# Altium PCB Zotino-DIOT.PCBDOC (part 4 of 11)
Units mil, origin at the board's own origin, x right, y up, seen from the top; angles counter-clockwise.
Board outline 8771.61 x 3949.04 mil, 4 copper layers (TopLayer, Internal Plane 2, Signal Layer 1, BottomLayer), stack 61.54 mil thick; 915 components, 534 nets, 3073 pads, 1180 vias.
Unrouted connection lines stored in the file: 36.
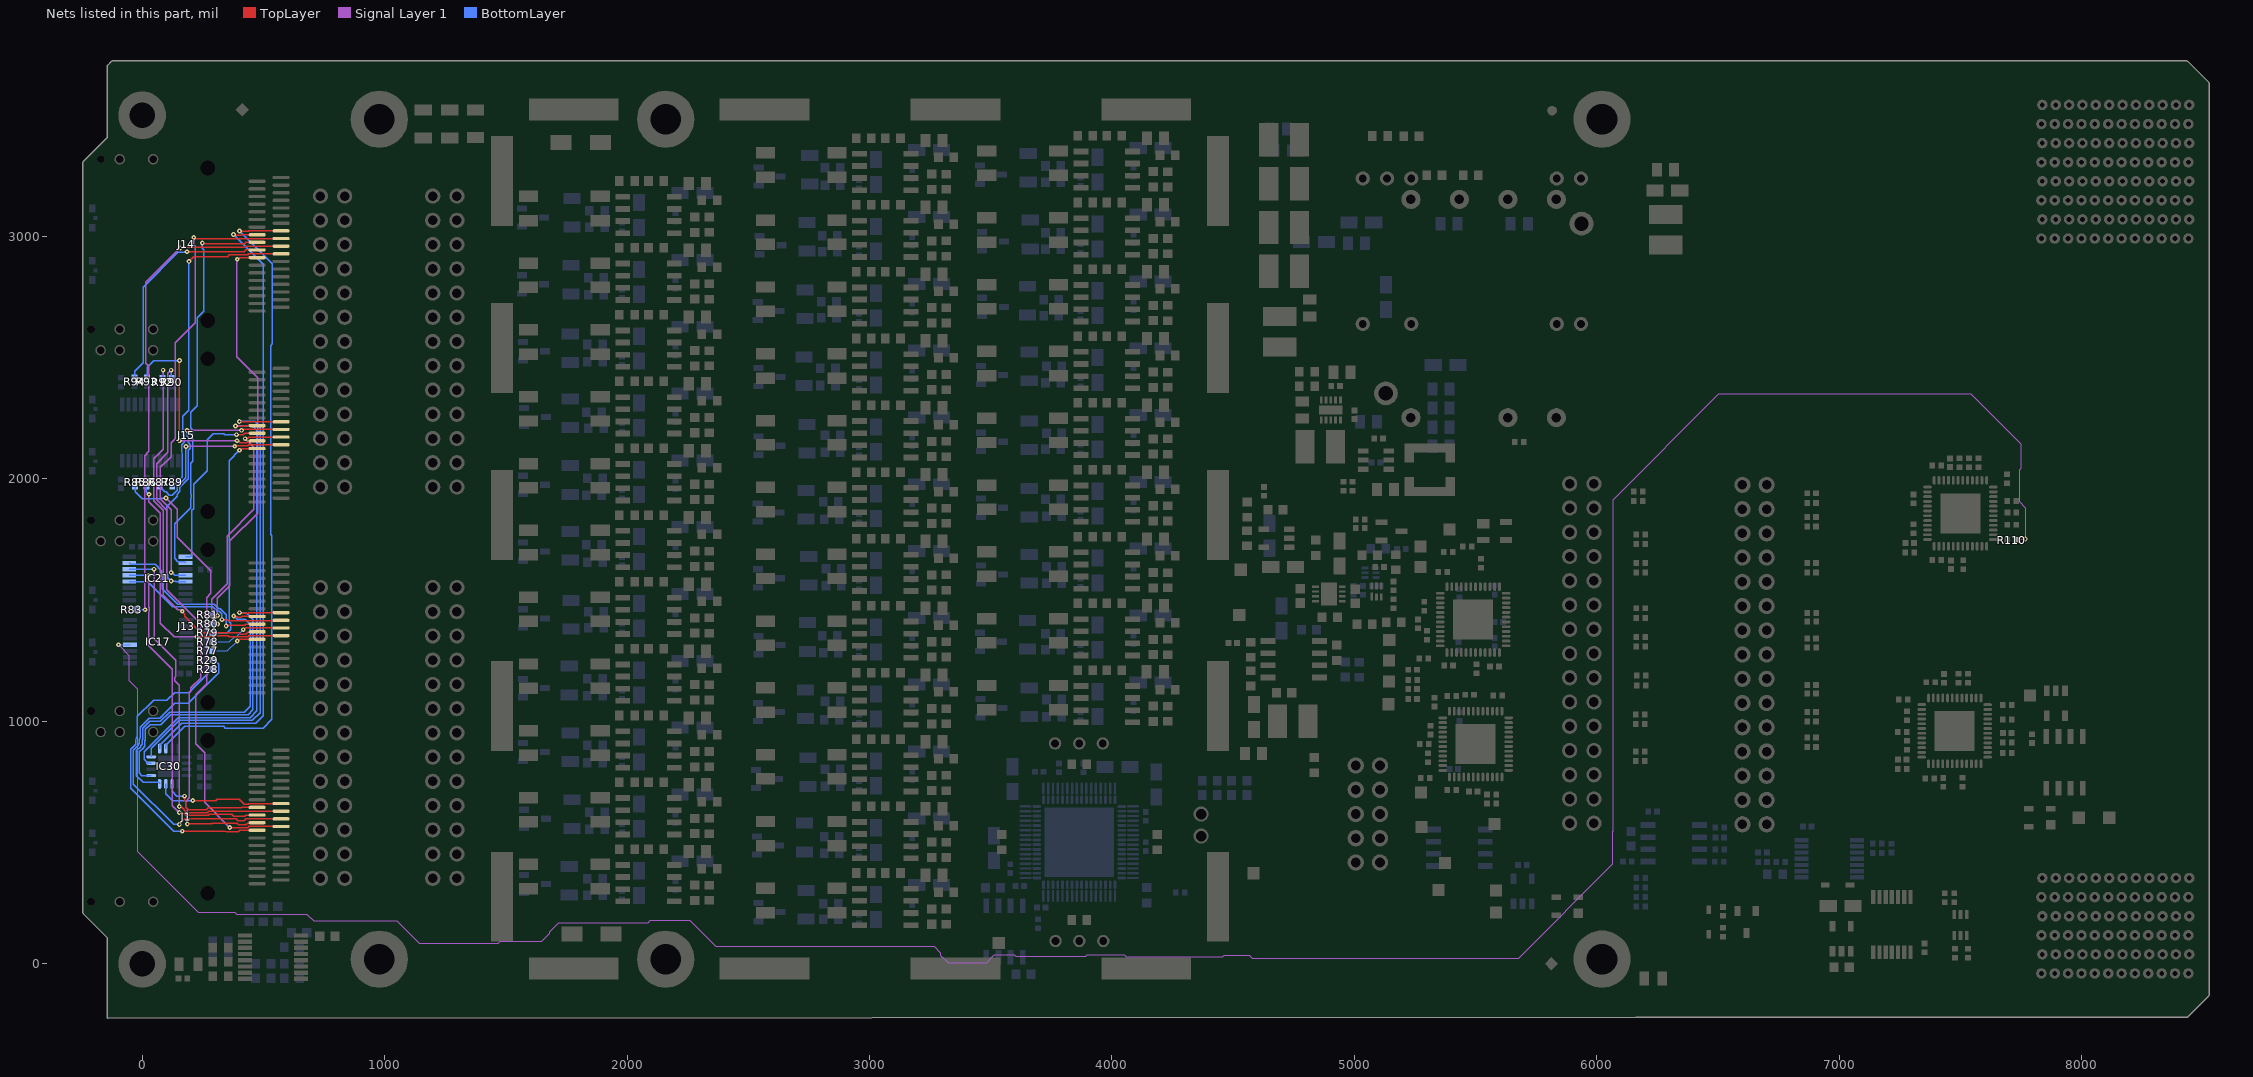
[diagram p5: the nets of this part, all layers, seen from the top]

## Part data (continued)
IC35: "4.75-28VDC to 1-6VDC, 500mA Step-Down Converter With Sleep Mode", Case=SON10, Manufacturer="TEXAS INSTRUMENTS", Author="CERN DEM JMW", Bonding=No, ComponentHeight=0.8mm, Component Type=Standard, CreateDate=11.08.2015, Device=TPS62175DQC, HelpURL=\\cern.ch\dfs\Applications\Altium\Datasheets\TPS62175DQC.pdf, LatestRevisionDate=11.08.2015, Manufacturer Part Number=TPS62175DQC, Mounted=Yes, PackageDescription="SON, 10-Leads, Body 2x3mm, Pitch 0.5mm, Thermal Pad 0.94x2.5mm, IPC Medium Density", Part Description="4.75-28VDC to 1-6VDC, 500mA Step-Down Converter With Sleep Mode", Part Number=TPS62175DQC, Pin Count=11, PressFit=No, Sense=No, SMD=Yes, Socket=No
J1 J13 J14 J15: library part MOLEX_75783-0107, "36 Circuit, Right Angle , Internal Assembly, iPass™ I/O Surface Mount Receptacle with Left Key Shell", Manufacturer=MOLEX, Manufacturer Part Number="75783-0107 / 75783-0136", Part Number="MOLEX 75783-0107 / 75783-0136", Author="CERN DEM JLC", Component Type=Standard, ComponentHeight=8.47mm, CreateDate=12.11.2014, Family=iPass™, HelpURL=\\cern.ch\dfs\Applications\Altium\Datasheets\MOLEX_75783-0107.pdf, LatestRevisionDate=12.11.2014, Mounted=Yes, Part Description="36 Circuit, Right Angle , Internal Assembly, iPass™ I/O Surface Mount Receptacle with Left Key Shell", Pin Count=42, PressFit=No, Sense=No, SMD=Yes, Socket=No, Status=None
J2: library part 3M_N2510-6002RB, "Connector 10 Male", Manufacturer=3M, Manufacturer Part Number=N2510-6002RB, Author="CERN DEM JLC", Component Type=Standard, ComponentHeight=10.03mm, CreateDate=11.02.2009, Family="Header 10", HelpURL=\\cern.ch\dfs\Applications\Altium\Datasheets\3M_N2510-6002RB.pdf, LatestRevisionDate=11.08.2009, Mounted=Yes, Part Description="10 Contacts - Straight .100'' x .100'' Low Profile Four-Wall Header, 2500 Series", Part Number=3M_N2510-6002RB, Pin Count=10, PressFit=No, Sense=No, SMD=No, Socket=No, Status=None
J3 J4 J5 J7: library part 3M_N2526-6002RB, "Connector 26 Male", Manufacturer=3M, Manufacturer Part Number=N2526-6002RB, Author="CERN DEM JLC", ComponentHeight=10.03mm, Component Type=Standard, CreateDate=11.02.2009, Family="Header 26", HelpURL=\\cern.ch\dfs\Applications\Altium\Datasheets\3M_N2526-6002RB.pdf, LatestRevisionDate=11.08.2009, Mounted=Yes, Part Description="26 Contacts - Straight .100'' x .100'' Low Profile Four-Wall Header, 2500 Series", Part Number=3M_N2526-6002RB, Pin Count=26, PressFit=No, Sense=No, SMD=No, Socket=No, Status=None
J6 J37: library part 3M_N2530-6002RB, "Connector 30 Male", Manufacturer=3M, Manufacturer Part Number=N2530-6002RB, Author="CERN DEM JLC", Component Type=Standard, ComponentHeight=10.03mm, CreateDate=11.02.2009, Family="Header 30", HelpURL=\\cern.ch\dfs\Applications\Altium\Datasheets\3M_N2530-6002RB.pdf, LatestRevisionDate=11.08.2009, Mounted=Yes, Part Description="30 Contacts - Straight .100'' x .100'' Low Profile Four-Wall Header, 2500 Series", Part Number=3M_N2530-6002RB, Pin Count=30, PressFit=No, Sense=No, SMD=No, Socket=No, Status=None
J8: library part AMPHENOL_10052825-101LF, "72 Contacts Header, 6 Columns, 4 Pairs per Column", Manufacturer=AMPHENOL, Manufacturer Part Number=10052825-101LF, Author="CERN DEM MR", ClassName=Overlapping, Component Type=Standard, ComponentHeight=15.35mm, ComponentLink1Description=Application, ComponentLink1URL=\\cern.ch\dfs\Applications\Altium\Datasheets\AMPHENOL_10052825-101LF_Application.pdf, CreateDate=19/02/2018, Family="AirMax VS", HelpURL=\\cern.ch\dfs\Applications\Altium\Datasheets\AMPHENOL_10052825-101LF.pdf, LatestRevisionDate=19/02/2018, Mounted=Yes, Part Description="72 Contacts, 2mm Pitch, 6 Columns, 4 Pairs per Column, 4 Walls, Right Angle Header", Part Number=AMPHENOL_10052825-101LF, Pin Count=72, PressFit=Yes, Sense=No, SMD=No, Socket=No, Status=None
J9: library part AMPHENOL_10052838-101LF, "96 Contacts Header, 8 Columns, 4 Pairs per Column", Manufacturer=AMPHENOL, Manufacturer Part Number=10052838-101LF, Author="CERN DEM MR", Component Type=Standard, ComponentHeight=15.35mm, ComponentLink1Description=Application, ComponentLink1URL=\\cern.ch\dfs\Applications\Altium\Datasheets\AMPHENOL_10052838-101LF_Application.pdf, CreateDate=19.02.2018, Family="AirMax VS", HelpURL=\\cern.ch\dfs\Applications\Altium\Datasheets\AMPHENOL_10052838-101LF.pdf, LatestRevisionDate=19.02.2018, Mounted=Yes, Part Description="96 Contacts, 2mm Pitch, 8 Columns, 4 Pairs per Column, 4 Walls, Right Angle Header", Part Number=AMPHENOL_10052838-101LF, Pin Count=96, PressFit=Yes, Sense=No, SMD=No, Socket=No, Status=None
L1 L3 L6 L7 L8 L9 L15 L16: library part IND_10UH_10%_MURATA-PS_8400, "Inductor With Core", Manufacturer="MURATA POWER SOLUTIONS", Manufacturer Part Number=84103C, Power=950mA, Resistance=0.24R, Tolerance=±10%, Author="CERN DEM JLC", ComponentHeight=2.9mm, Component Type=Standard, CreateDate=02.07.2012, HelpURL=\\cern.ch\dfs\Applications\Altium\Datasheets\IND_MURATA-PS_8400.pdf, LatestRevisionDate=02.07.2012, Mounted=Yes, Part Description="Miniature Surface Mount Power Inductor (8400 Serie)", Part Number=IND_10UH_10%_MURATA-PS_8400, Pin Count=2, Sense=No, SMD=Yes, Socket=No, Status=None
L2: library part IND_3.3UH_30%_WURTH_WE-TPC_744043003, "Inductor With Core", Manufacturer="WURTH ELEKTRONIK", Manufacturer Part Number=744043003, Power=2.15A, Resistance=0.03R, Tolerance=±30%, Author="CERN DEM JLC", Component Type=Standard, ComponentHeight=3mm, CreateDate=12.07.2011, HelpURL=\\cern.ch\dfs\Applications\Altium\Datasheets\IND_WURTH_WE-TPC_744043003.pdf, LatestRevisionDate=24.01.2012, Mounted=Yes, Part Description="Shielded Tiny Power Inductor (WE-TPC Serie)", Part Number=IND_3.3UH_30%_WURTH_WE-TPC_744043003, Pin Count=2, Sense=No, SMD=Yes, Socket=No
L4_1 L4_2 L4_3 L4_4 L4_5 L4_6 L4_7 L4_8 L4_9 L4_10 L4_11 L4_12 L4_13 L4_14 L4_15 L4_16 L4_17 L4_18 L4_19 L4_20 L4_21 L4_22 L4_23 L4_24 L4_25 L4_26 L4_27 L4_28 L4_29 L4_30 L4_31 L4_32: library part IND_6.5MH_50%_WURTH_WE-SL2-744229, "Inductor Common Mode", Manufacturer="WURTH ELEKTRONIK", Manufacturer Part Number=744229, Power=400mA, Resistance=0.95R, Tolerance=±50%, Author="CERN DEM JLC", ComponentHeight=5.3mm, Component Type=Standard, CreateDate=01.10.2012, HelpURL=\\cern.ch\dfs\Applications\Altium\Datasheets\IND_WURTH_WE-SL2_744229.pdf, LatestRevisionDate=15.10.2012, Mounted=Yes, Part Description="Common Mode SMD Line Filter (WE-SL2 Serie)", Part Number=IND_6.5MH_50%_WURTH_WE-SL2-744229, Pin Count=4, Sense=No, SMD=Yes, Socket=No, Status=None
LD1 LD2 LD3 LD4 LD5 LD6 LD7 LD8: library part LED_AVAGO_HSME-C120, "LED Green 1C 2A", Manufacturer="AVAGO TECHNOLOGIES", Manufacturer Part Number=HSME-C120, Author="CERN DEM JMW", Bonding=No, Color=Green, Component Type=Standard, ComponentHeight=0.7mm, ComponentLink1Description="Design Guide", ComponentLink1URL=\\cern.ch\dfs\Applications\Altium\Datasheets\LED_AVAGO_HSME-C110_DESIGN-GUIDE.pdf, CreateDate=22.07.2009, HelpURL=\\cern.ch\dfs\Applications\Altium\Datasheets\LED_AVAGO_HSME-C120.pdf, LatestRevisionDate=20.06.2012, Mounted=Yes, PackageDescription="Green Chip LED, 2-Leads, Body 1.7x1.1mm, Side Emitting Package", Part Description="High Performance Right Angle Chip Green LED", Part Number=LED_AVAGO_HSME-C120, Pin Count=2, PressFit=No, Sense=No, SMD=Yes, Socket=No
R1 R15 R26 R68_1 R68_2 R68_3 R68_4 R68_5 R68_6 R68_7 R68_8 R68_9 R68_10 R68_11 R68_12 R68_13 R68_14 R68_15 R68_16 R68_17 R68_18 R68_19 R68_20 R68_21 R68_22 R68_23 R68_24 R68_25 R68_26 R68_27 R68_28 R68_29 R68_30 R68_31 R68_32: library part R0603_NO-VALUE, "Resistor", Case=0603, Author="CERN DEM JLC", Component Type=Standard, CreateDate=03.12.2007, HelpURL=Undefined, LatestRevisionDate=13.03.2008, Manufacturer=Undefined, Manufacturer1 ComponentHeight=Undefined, Manufacturer1 Example=Undefined, Manufacturer1 Part Number=Undefined, Manufacturer Part Number=R0603_NO-VALUE, Mounted=No, Part Description="Reserved Footprint For a 0603 (1608) Chip Resistor", Part Number=R0603_NO-VALUE, Pin Count=2, Sense=No, SMD=Yes, Socket=No, Status=None
R2 R3 R11 R13 R14 R37 R41 R42 R45 R46 R47 R48 R49 R50 R51 R52 R53 R54 R55 R56 R57 R59 R60 R61 R62 R63 R64 R65 R66 R71 R72 R88 R97 R99 R100 R101 R104 R107 R110 R125 R128 R131 R135 R136 R137 R138 R139 R140 R142 R143 R145 R146 R148 R149 R152 R154 R155 R156 R158 R159 R161 R165 R183 R221: library part R0402_0R_JUMPER, "Resistor", Case=0402, Manufacturer=GENERIC, Manufacturer1 ComponentHeight=0.4mm, Manufacturer1 Example="YAGEO PHYCOMP", Manufacturer1 Part Number=232270591001L, Author="CERN DEM JLC", Component Type=Standard, CreateDate=03.12.2007, HelpURL=\\cern.ch\dfs\Applications\Altium\Datasheets\R0402_Phycomp_RC0402.pdf, LatestRevisionDate=17.10.2012, Manufacturer Part Number=R0402_0R_JUMPER, Mounted=Yes, Part Description="1A (0.05R Max DC Resistance) Zero Ohm Jumper", Part Number=R0402_0R_JUMPER, Pin Count=2, Sense=No, SMD=Yes, Socket=No
  R2 R3 R11 R13 R14 R37 R41 R42 R51 R88 R97 R99 R100 R101 R104 R107 R110 R125 R128 R131 R135 R183 R221: Status="Not recommended"
  R45 R46 R47 R48 R49 R50 R52 R53 R54 R55 R56 R57 R59 R60 R61 R62 R63 R64 R65 R66 R71 R72 R136 R137 R138 R139 R140 R142 R143 R145 R146 R148 R149 R152 R154 R155 R156 R158 R159 R161 R165: PressFit=No, Status="Not Recommended"
R4: library part R0603_36K_1%_0.1W_100PPM, "Resistor - 1%", Case=0603, Manufacturer=GENERIC, Manufacturer1 ComponentHeight=0.55mm, Manufacturer1 Example="NIC COMPONENT", Manufacturer1 Part Number=NRC06F3602TRF, Power=0.1W, Tolerance=±1%, Author="CERN DEM JLC", Component Type=Standard, CreateDate=03.12.2007, HelpURL=\\cern.ch\dfs\Applications\Altium\Datasheets\R0603_NIC_NRC.pdf, LatestRevisionDate=13.03.2008, Manufacturer Part Number=R0603_36K_1%_0.1W_100PPM, Mounted=Yes, Part Description="General Purpose Thick Film Chip Resistor", Part Number=R0603_36K_1%_0.1W_100PPM, Pin Count=2, PressFit=No, Sense=No, SMD=Yes, Socket=No, Status=Preferred, TC=±100ppm/°C
R5_1 R5_2 R5_3 R5_4 R5_5 R5_6 R5_7 R5_8 R5_9 R5_10 R5_11 R5_12 R5_13 R5_14 R5_15 R5_16 R5_17 R5_18 R5_19 R5_20 R5_21 R5_22 R5_23 R5_24 R5_25 R5_26 R5_27 R5_28 R5_29 R5_30 R5_31 R5_32 R7_1 R7_2 R7_3 R7_4 R7_5 R7_6 R7_7 R7_8 R7_9 R7_10 R7_11 R7_12 R7_13 R7_14 R7_15 R7_16 R7_17 R7_18 R7_19 R7_20 R7_21 R7_22 R7_23 R7_24 R7_25 R7_26 R7_27 R7_28 R7_29 R7_30 R7_31 R7_32 R40: library part R0603_1K_1%_0.1W_100PPM, "Resistor - 1%", Case=0603, Manufacturer=GENERIC, Manufacturer1 ComponentHeight=0.55mm, Manufacturer1 Example="NIC COMPONENT", Manufacturer1 Part Number=NRC06F1001TRF, Power=0.1W, Tolerance=±1%, Author="CERN DEM JLC", Component Type=Standard, CreateDate=03.12.2007, HelpURL=\\cern.ch\dfs\Applications\Altium\Datasheets\R0603_NIC_NRC.pdf, LatestRevisionDate=13.03.2008, Manufacturer Part Number=R0603_1K_1%_0.1W_100PPM, Mounted=Yes, Part Description="General Purpose Thick Film Chip Resistor", Part Number=R0603_1K_1%_0.1W_100PPM, Pin Count=2, PressFit=No, Sense=No, SMD=Yes, Socket=No, Status=Preferred, TC=±100ppm/°C
R6 R16 R17 R18 R19 R20 R21 R22 R23 R95 R96 R98 R102 R103 R105 R106 R108 R109 R111 R112 R124 R126 R127 R129 R130 R133 R134 R141 R144 R147 R151 R157 R160 R163 R166 R170: library part R0402_100R_1%_0.1W_100PPM, "Resistor - 1%", Case=0402, Manufacturer=GENERIC, Manufacturer1 ComponentHeight=0.4mm, Manufacturer1 Example=PANASONIC, Manufacturer1 Part Number=ERJ2RKF1000X, Manufacturer Part Number=R0402_100R_1%_0.1W_100PPM_50V, Power=0.1W, Tolerance=±1%, Voltage=50V, Author="CERN DEM JLC", Component Type=Standard, CreateDate=12.12.2013, HelpURL=\\cern.ch\dfs\Applications\Altium\Datasheets\R0402_PANASONIC_ERJ2RK.pdf, LatestRevisionDate=03.03.2015, Mounted=Yes, Part Description="General Purpose Thick Film Chip Resistor", Part Number=R0402_100R_1%_0.1W_100PPM, Pin Count=2, Sense=No, SMD=Yes, Socket=No, Status="Not recommended", TC=±100ppm/°C
R8 R9 R10 R12 R58 R82 R113 R114 R115 R116 R117 R118 R119 R120 R121 R122 R123: library part R0603_220R_1%_0.1W_100PPM, "Resistor - 1%", Case=0603, Manufacturer=GENERIC, Manufacturer1 ComponentHeight=0.55mm, Manufacturer1 Example="NIC COMPONENT", Manufacturer1 Part Number=NRC06F2200TRF, Power=0.1W, Tolerance=±1%, Author="CERN DEM JLC", Component Type=Standard, CreateDate=03.12.2007, HelpURL=\\cern.ch\dfs\Applications\Altium\Datasheets\R0603_NIC_NRC.pdf, LatestRevisionDate=13.03.2008, Manufacturer Part Number=R0603_220R_1%_0.1W_100PPM, Mounted=Yes, Part Description="General Purpose Thick Film Chip Resistor", Part Number=R0603_220R_1%_0.1W_100PPM, Pin Count=2, Sense=No, SMD=Yes, Socket=No, Status=Preferred, TC=±100ppm/°C
R24_1 R24_2 R24_3 R24_4 R24_5 R24_6 R24_7 R24_8 R24_9 R24_10 R24_11 R24_12 R24_13 R24_14 R24_15 R24_16 R24_17 R24_18 R24_19 R24_20 R24_21 R24_22 R24_23 R24_24 R24_25 R24_26 R24_27 R24_28 R24_29 R24_30 R24_31 R24_32: library part R0603_2K32_0.1%_0.063W_10PPM, "Resistor - 0.1%", Case=0603, Manufacturer=GENERIC, Manufacturer1 ComponentHeight=0.5mm, Manufacturer1 Example="TYCO HOLSWORTHY", Manufacturer1 Part Number=RN73C1J2K32BTDF, Power=0.063W, Tolerance=±0.1%, Author="CERN DEM JLC", Component Type=Standard, CreateDate=03.12.2007, HelpURL=\\cern.ch\dfs\Applications\Altium\Datasheets\R0603_Tyco_RN73.pdf, LatestRevisionDate=13.03.2008, Manufacturer Part Number=R0603_2K32_0.1%_0.063W_10PPM, Mounted=Yes, Part Description="Thin Film Chip Resistor", Part Number=R0603_2K32_0.1%_0.063W_10PPM, Pin Count=2, Sense=No, SMD=Yes, Socket=No, Status="Not recommended", TC=±10ppm
R25_1 R25_2 R25_3 R25_4 R25_5 R25_6 R25_7 R25_8 R25_9 R25_10 R25_11 R25_12 R25_13 R25_14 R25_15 R25_16 R25_17 R25_18 R25_19 R25_20 R25_21 R25_22 R25_23 R25_24 R25_25 R25_26 R25_27 R25_28 R25_29 R25_30 R25_31 R25_32: library part R0603_9K09_0.1%_0.063W_10PPM, "Resistor - 0.1%", Case=0603, Manufacturer=GENERIC, Manufacturer1 ComponentHeight=0.5mm, Manufacturer1 Example="TYCO HOLSWORTHY", Manufacturer1 Part Number=RN73C1J9K09BTDF, Power=0.063W, Tolerance=±0.1%, Author="CERN DEM JLC", Component Type=Standard, CreateDate=03.12.2007, HelpURL=\\cern.ch\dfs\Applications\Altium\Datasheets\R0603_Tyco_RN73.pdf, LatestRevisionDate=13.03.2008, Manufacturer Part Number=R0603_9K09_0.1%_0.063W_10PPM, Mounted=Yes, Part Description="Thin Film Chip Resistor", Part Number=R0603_9K09_0.1%_0.063W_10PPM, Pin Count=2, Sense=No, SMD=Yes, Socket=No, Status="Not recommended", TC=±10ppm
R27: library part R0603_12K7_0.1%_0.063W_10PPM, "Resistor - 0.1%", Case=0603, Manufacturer=GENERIC, Manufacturer1 ComponentHeight=0.5mm, Manufacturer1 Example="TYCO HOLSWORTHY", Manufacturer1 Part Number=RN73C1J12K7BTDF, Power=0.063W, Tolerance=±0.1%, Author="CERN DEM JLC", Component Type=Standard, CreateDate=03.12.2007, HelpURL=\\cern.ch\dfs\Applications\Altium\Datasheets\R0603_Tyco_RN73.pdf, LatestRevisionDate=13.03.2008, Manufacturer Part Number=R0603_12K7_0.1%_0.063W_10PPM, Mounted=Yes, Part Description="Thin Film Chip Resistor", Part Number=R0603_12K7_0.1%_0.063W_10PPM, Pin Count=2, PressFit=No, Sense=No, SMD=Yes, Socket=No, Status="Not Recommended", TC=±10ppm
R28 R29 R77 R78 R79 R80 R81 R83 R85 R86 R87 R89 R90 R92 R93 R94: library part R0402_33R_1%_0.0625W_100PPM, "Resistor - 1%", Case=0402, Manufacturer=GENERIC, Manufacturer1 ComponentHeight=0.4mm, Manufacturer1 Example="YAGEO PHYCOMP", Manufacturer1 Part Number=232270673309L, Power=0.0625W, Tolerance=±1%, Author="CERN DEM JLC", Component Type=Standard, CreateDate=03.12.2007, HelpURL=\\cern.ch\dfs\Applications\Altium\Datasheets\R0402_Phycomp_RC0402.pdf, LatestRevisionDate=17.10.2012, Manufacturer Part Number=R0402_33R_1%_0.0625W_100PPM, Mounted=Yes, Part Description="General Purpose Thick Film Chip Resistor", Part Number=R0402_33R_1%_0.0625W_100PPM, Pin Count=2, PressFit=No, Sense=No, SMD=Yes, Socket=No, Status="Not Recommended", TC=±100ppm/°C
R30 R31 R32: library part R1206_NO-VALUE, "Resistor", Case=1206, Manufacturer1 ComponentHeight=0.65mm, Author="CERN DEM JLC", Component Type=Standard, CreateDate=03.12.2007, HelpURL=Undefined, LatestRevisionDate=13.03.2008, Manufacturer=Undefined, Manufacturer1 Example=Undefined, Manufacturer1 Part Number=Undefined, Manufacturer Part Number=R1206_NO-VALUE, Mounted=No, Part Description="Reserved Footprint For a 1206 (3216) Chip Resistor", Part Number=R1206_NO-VALUE, Pin Count=2, PressFit=No, Sense=No, SMD=Yes, Socket=No, Status=None
R33: library part R0402_31K6_0.1%_0.063W_25PPM_YAGEO_RT, "Resistor - 0.1%", Case=0402, Manufacturer=YAGEO, Manufacturer Part Number=RT0402BRD0731K6L, Power=0.063W, Tolerance=±0.1%, Voltage=50V, Author="CERN DEM BC", Component Type=Standard, ComponentHeight=0.35mm, CreateDate=30.07.2020, HelpURL=\\cern.ch\dfs\Applications\Altium\Datasheets\R0402_YAGEO_RT.pdf, LatestRevisionDate=30.07.2020, Mounted=Yes, Part Description="Thin Film Chip Resistor", Part Number=R0402_31K6_0.1%_0.063W_25PPM_YAGEO_RT, Pin Count=2, PressFit=No, Sense=No, SMD=Yes, Socket=No, Status="Not Recommended", TC=±25ppm/°C
R34 R36 R38 R76 R84 R132 R171 R220 R224 R225 R229: library part R0402_10K_1%_0.0625W_100PPM, "Resistor - 1%", Case=0402, Manufacturer=GENERIC, Manufacturer1 ComponentHeight=0.4mm, Manufacturer1 Example="YAGEO PHYCOMP", Manufacturer1 Part Number=232270671003L, Power=0.0625W, Tolerance=±1%, Author="CERN DEM JLC", Component Type=Standard, HelpURL=\\cern.ch\dfs\Applications\Altium\Datasheets\R0402_Phycomp_RC0402.pdf, Manufacturer Part Number=R0402_10K_1%_0.0625W_100PPM, Mounted=Yes, Part Description="General Purpose Thick Film Chip Resistor", Part Number=R0402_10K_1%_0.0625W_100PPM, Pin Count=2, Sense=No, SMD=Yes, Socket=No, TC=±100ppm/°C
  R34 R36 R38 R132 R171: CreateDate=03.12.2007, LatestRevisionDate=17.10.2012, Status="Not recommended"
  R76 R220 R229: CreateDate=2007-12-03, LatestRevisionDate=2012-10-17, PressFit=No, Status="Not Recommended"
  R84 R224 R225: CreateDate=03.12.2007, LatestRevisionDate=17.10.2012, PressFit=No, Status="Not Recommended"
R35 R39 R43 R69 R150: library part R0603_24K_1%_0.1W_100PPM, "Resistor - 1%", Case=0603, Manufacturer=GENERIC, Manufacturer1 ComponentHeight=0.55mm, Manufacturer1 Example="NIC COMPONENT", Manufacturer1 Part Number=NRC06F2402TRF, Power=0.1W, Tolerance=±1%, Author="CERN DEM JLC", Component Type=Standard, CreateDate=03.12.2007, HelpURL=\\cern.ch\dfs\Applications\Altium\Datasheets\R0603_NIC_NRC.pdf, LatestRevisionDate=13.03.2008, Manufacturer Part Number=R0603_24K_1%_0.1W_100PPM, Mounted=Yes, Part Description="General Purpose Thick Film Chip Resistor", Part Number=R0603_24K_1%_0.1W_100PPM, Pin Count=2, Sense=No, SMD=Yes, Socket=No, Status=Preferred, TC=±100ppm/°C
R44 R70 R153 R222: library part R0603_2K7_1%_0.1W_100PPM, "Resistor - 1%", Case=0603, Manufacturer=GENERIC, Manufacturer1 ComponentHeight=0.55mm, Manufacturer1 Example="YAGEO PHYCOMP", Manufacturer1 Part Number=RC0603FR-072K7L, Power=0.1W, Tolerance=±1%, Author="CERN DEM JLC", Component Type=Standard, HelpURL=\\cern.ch\dfs\Applications\Altium\Datasheets\R0603_PHYCOMP_RC0603.pdf, Manufacturer Part Number=R0603_2K7_1%_0.1W_100PPM, Mounted=Yes, Part Description="General Purpose Thick Film Chip Resistor", Part Number=R0603_2K7_1%_0.1W_100PPM, Pin Count=2, Sense=No, SMD=Yes, Socket=No, Status=Preferred, TC=±100ppm/°C
  R44 R70 R153: CreateDate=02.05.2011, LatestRevisionDate=02.05.2011
  R222: CreateDate=2011-05-02, LatestRevisionDate=2011-05-02, PressFit=No
R67_1 R67_2 R67_3 R67_4 R67_5 R67_6 R67_7 R67_8 R67_9 R67_10 R67_11 R67_12 R67_13 R67_14 R67_15 R67_16 R67_17 R67_18 R67_19 R67_20 R67_21 R67_22 R67_23 R67_24 R67_25 R67_26 R67_27 R67_28 R67_29 R67_30 R67_31 R67_32: library part R0603_11K_1%_0.1W_100PPM, "Resistor - 1%", Case=0603, Manufacturer=GENERIC, Manufacturer1 ComponentHeight=0.55mm, Manufacturer1 Example="NIC COMPONENT", Manufacturer1 Part Number=NRC06F1102TRF, Power=0.1W, Tolerance=±1%, Author="CERN DEM JLC", Component Type=Standard, CreateDate=03.12.2007, HelpURL=\\cern.ch\dfs\Applications\Altium\Datasheets\R0603_NIC_NRC.pdf, LatestRevisionDate=13.03.2008, Manufacturer Part Number=R0603_11K_1%_0.1W_100PPM, Mounted=Yes, Part Description="General Purpose Thick Film Chip Resistor", Part Number=R0603_11K_1%_0.1W_100PPM, Pin Count=2, Sense=No, SMD=Yes, Socket=No, Status=Preferred, TC=±100ppm/°C
R73: library part R0805_1M1_1%_0.125W_100PPM, "Resistor - 1%", Case=0805, Manufacturer=GENERIC, Manufacturer1 ComponentHeight=0.6mm, Manufacturer1 Example="NIC COMPONENT", Manufacturer1 Part Number=NRC10F1104TRF, Power=0.125W, Tolerance=±1%, Author="CERN DEM JLC", Component Type=Standard, CreateDate=03/12/2007, HelpURL=\\cern.ch\dfs\Applications\Altium\Datasheets\R0805_NIC_NRC.pdf, LatestRevisionDate=13/03/2008, Manufacturer Part Number=R0805_1M1_1%_0.125W_100PPM, Mounted=Yes, Part Description="General Purpose Thick Film Chip Resistor", Part Number=R0805_1M1_1%_0.125W_100PPM, Pin Count=2, PressFit=No, Sense=No, SMD=Yes, Socket=No, Status=Preferred, TC=±100ppm/°C
R74 R75: library part "R0805_10M_1%_0.125W_100PPM_VISHAY_CRCW e3", "Resistor - 1%", Case=0805, Manufacturer="VISHAY DALE", Manufacturer Part Number=CRCW080510M0FKEA, Power=0.125W, Tolerance=±1%, Author="CERN DEM BC", Component Type=Standard, ComponentHeight=0.5mm, CreateDate=2019-11-12, HelpURL="\\cern.ch\dfs\Applications\Altium\Datasheets\R0805_VISHAY_CRCW e3.pdf", LatestRevisionDate=2019-11-12, Mounted=Yes, Part Description="150V, Standard Thick Film Chip Resistor", Part Number="R0805_10M_1%_0.125W_100PPM_VISHAY_CRCW e3", Pin Count=2, PressFit=No, Sense=No, SMD=Yes, Socket=No, Status=None, TC=±100ppm/°C
R91 R298: library part R0402_240R_1%_0.0625W_100PPM, "Resistor - 1%", Case=0402, Manufacturer=GENERIC, Manufacturer1 ComponentHeight=0.4mm, Manufacturer1 Example="YAGEO PHYCOMP", Manufacturer1 Part Number=232270672401L, Power=0.0625W, Tolerance=±1%, Author="CERN DEM JLC", Component Type=Standard, CreateDate=03.12.2007, HelpURL=\\cern.ch\dfs\Applications\Altium\Datasheets\R0402_Phycomp_RC0402.pdf, LatestRevisionDate=17.10.2012, Manufacturer Part Number=R0402_240R_1%_0.0625W_100PPM, Mounted=Yes, Part Description="General Purpose Thick Film Chip Resistor", Part Number=R0402_240R_1%_0.0625W_100PPM, Pin Count=2, PressFit=No, Sense=No, SMD=Yes, Socket=No, Status="Not Recommended", TC=±100ppm/°C
R162: library part R0603_270K_1%_0.1W_100PPM, "Resistor - 1%", Case=0603, Manufacturer=GENERIC, Manufacturer1 ComponentHeight=0.55mm, Manufacturer1 Example="NIC COMPONENT", Manufacturer1 Part Number=NRC06F2703TRF, Power=0.1W, Tolerance=±1%, Author="CERN DEM JLC", Component Type=Standard, CreateDate=03.12.2007, HelpURL=\\cern.ch\dfs\Applications\Altium\Datasheets\R0603_NIC_NRC.pdf, LatestRevisionDate=13.03.2008, Manufacturer Part Number=R0603_270K_1%_0.1W_100PPM, Mounted=Yes, Part Description="General Purpose Thick Film Chip Resistor", Part Number=R0603_270K_1%_0.1W_100PPM, Pin Count=2, Sense=No, SMD=Yes, Socket=No, Status=Preferred, TC=±100ppm/°C
R164: library part R0603_82K_1%_0.1W_100PPM, "Resistor - 1%", Case=0603, Manufacturer=GENERIC, Manufacturer1 ComponentHeight=0.55mm, Manufacturer1 Example="NIC COMPONENT", Manufacturer1 Part Number=NRC06F8202TRF, Power=0.1W, Tolerance=±1%, Author="CERN DEM JLC", Component Type=Standard, CreateDate=03.12.2007, HelpURL=\\cern.ch\dfs\Applications\Altium\Datasheets\R0603_NIC_NRC.pdf, LatestRevisionDate=13.03.2008, Manufacturer Part Number=R0603_82K_1%_0.1W_100PPM, Mounted=Yes, Part Description="General Purpose Thick Film Chip Resistor", Part Number=R0603_82K_1%_0.1W_100PPM, Pin Count=2, Sense=No, SMD=Yes, Socket=No, Status=Preferred, TC=±100ppm/°C
R185 R205: library part R0402_22R_1%_0.0625W_100PPM, "Resistor - 1%", Case=0402, Manufacturer=GENERIC, Manufacturer1 ComponentHeight=0.4mm, Manufacturer1 Example="YAGEO PHYCOMP", Manufacturer1 Part Number=232270672209L, Power=0.0625W, Tolerance=±1%, Author="CERN DEM JLC", Component Type=Standard, CreateDate=03.12.2007, HelpURL=\\cern.ch\dfs\Applications\Altium\Datasheets\R0402_Phycomp_RC0402.pdf, LatestRevisionDate=17.10.2012, Manufacturer Part Number=R0402_22R_1%_0.0625W_100PPM, Mounted=Yes, Part Description="General Purpose Thick Film Chip Resistor", Part Number=R0402_22R_1%_0.0625W_100PPM, Pin Count=2, PressFit=No, Sense=No, SMD=Yes, Socket=No, Status="Not Recommended"
R223: library part R0402_5K6_1%_0.0625W_100PPM, "Resistor - 1%", Case=0402, Manufacturer=GENERIC, Manufacturer1 ComponentHeight=0.4mm, Manufacturer1 Example="YAGEO PHYCOMP", Manufacturer1 Part Number=232270675602L, Power=0.0625W, Tolerance=±1%, Author="CERN DEM JLC", Component Type=Standard, CreateDate=2007-12-03, HelpURL=\\cern.ch\dfs\Applications\Altium\Datasheets\R0402_Phycomp_RC0402.pdf, LatestRevisionDate=2012-10-17, Manufacturer Part Number=R0402_5K6_1%_0.0625W_100PPM, Mounted=Yes, Part Description="General Purpose Thick Film Chip Resistor", Part Number=R0402_5K6_1%_0.0625W_100PPM, Pin Count=2, PressFit=No, Sense=No, SMD=Yes, Socket=No, Status="Not Recommended", TC=±100ppm/°C
R226 R227: library part R0402_1K6_1%_0.0625W_100PPM, "Resistor - 1%", Case=0402, Manufacturer=GENERIC, Manufacturer1 ComponentHeight=0.4mm, Manufacturer1 Example="YAGEO PHYCOMP", Manufacturer1 Part Number=232270671602L, Power=0.0625W, Tolerance=±1%, Author="CERN DEM JLC", Component Type=Standard, CreateDate=2007-12-03, HelpURL=\\cern.ch\dfs\Applications\Altium\Datasheets\R0402_Phycomp_RC0402.pdf, LatestRevisionDate=2012-10-17, Manufacturer Part Number=R0402_1K6_1%_0.0625W_100PPM, Mounted=Yes, Part Description="General Purpose Thick Film Chip Resistor", Part Number=R0402_1K6_1%_0.0625W_100PPM, Pin Count=2, PressFit=No, Sense=No, SMD=Yes, Socket=No, Status="Not Recommended", TC=±100ppm/°C
RT1: library part THERM_NTC_10K_EPCOS_B57330V2103J260, "Thermistor NTC (Negative Temperature Coefficient)", Case=0603, Manufacturer=EPCOS, Manufacturer Part Number=B57330V2103J260, Power=180mW, Tolerance=±5%, Author="CERN DEM BC", ComponentHeight=0.9mm, Component Type=Standard, CreateDate=30.07.2015, HelpURL=\\cern.ch\dfs\Applications\Altium\Datasheets\THERM_EPCOS_B573xxV2.pdf, LatestRevisionDate=30.07.2015, Mounted=Yes, Part Description="SMD NTC Thermistor for Temperature Measurement", Part Number=THERM_NTC_10K_EPCOS_B57330V2103J260, Pin Count=2, Sense=No, SMD=Yes, Socket=No, Status=None
SCREW1 SCREW2: library part MECH_Tyco_SCSI_Screwlock, "SCSI Screw Lock", Manufacturer="TYCO ELECTRONICS", Manufacturer Part Number=786585-2, Part Number=TYCO_786585-2, Author=GK, ComponentHeight=9.02mm, Component Type=Mechanical, CreateDate=10.09.2013, LatestRevisionDate=10.09.2013, Mounted=Yes, PackageDescription="50SR SCREWLOCK KIT, FEMALE", Part Description="50SR SCREWLOCK KIT, FEMALE", Pin Count=0, PressFit=No, Sense=No, SMD=No, Socket=No, Status=None
T10: "N-CHANNEL MOSFET WITH DIODE", Case=SOT23-3, Manufacturer="ON SEMICONDUCTOR", Author="CERN DEM JLC", Bonding=No, Component Type=Standard, ComponentHeight=1.11mm, CreateDate=23.03.2009, Device=BSS138LT1G, HelpURL=\\cern.ch\dfs\Applications\Altium\Datasheets\BSS138LT1G.pdf, LatestRevisionDate=23.03.2009, Manufacturer Part Number=BSS138LT1G, Mounted=Yes, PackageDescription="SOT23 3-Leads, Pitch 0.95mm - Body 1.4x3mm, IPC Medium Density", Part Description="50V 200mA N-Channel Enhancement Mode Field-Effect Transistor", Part Number=BSS138LT1G, Pin Count=3, PressFit=No, Sense=No, SMD=Yes, Socket=No
TEC1: library part TEC_CP20147H, "Peltier Module 15x15 mm"
TP1 TP2 TP3 TP4 TP5 TP6 TP7 TP8 TP9 TP10 TP11 TP12 TP13 TP14 TP15 TP16 TP17 TP18 TP19 TP20 TP21: library part SMD_PAD_1.27X1.27MM, Author="CERN DEM JLC", ComponentHeight=0mm, Component Type="Standard (No BOM)", CreateDate=12.01.2008, Family="Test Point", HelpURL=Undefined, LatestRevisionDate=12.01.2008, Mounted=No, PackageDescription="1.27mm x 1.27mm PCB Copper Area (SMD Test Point)", Part Description="1.27mm x 1.27mm PCB Copper Area (SMD Test Point)", Part Number=SMD_PAD_1.27X1.27MM, Pin Count=1, Sense=No, SMD=Yes, Socket=No, Status=None

## Free pads (board coordinates)
  round 236.22 hole 125.98: 0(2159.21,19.21) 0(6021.52,19.33) 0(6021.52,3483.89) 1(2159.21,3483.78) 2(978.11,3483.78) 3(978.11,19.21)

## Via types
v1: diameter 19.68, hole 7.87, TopLayer to BottomLayer, tented both sides, 1050 vias
v2: diameter 23.62, hole 11.81, TopLayer to BottomLayer, tented both sides, 56 vias
v3: diameter 23.62, hole 11.81, TopLayer to BottomLayer, 28 vias
v4: diameter 39.37, hole 23.62, TopLayer to BottomLayer, tented both sides, 28 vias
v5: diameter 39.37, hole 19.68, TopLayer to BottomLayer, tented both sides, 7 vias
v6: diameter 19.68, hole 7.87, TopLayer to BottomLayer, tented bottom, 7 vias
v7: diameter 19.68, hole 7.87, TopLayer to BottomLayer, 4 vias

## Nets (pads, with @x,y where several pads share a name; then routed paths per layer and width w, separated by ;. In a path a pad name is that pad's centre, name@x,y a point inside that pad or via, vN(x,y) a via of type N, cw(c..) or ccw(c..) an arc to the next point about the centre after c; other vN are vias at no path point)
AFE0_CSN0: J1.A8 R28.2 | length 1289.3
  TopLayer w6: v1(165.35,547.24) 343.11,547.24 346.23,544.13 395.96,544.13 402.54,550.72 J1.A8@474.17,550.72
  BottomLayer w6: v1(165.35,547.24) 129.92,547.24 -47.06,724.22 -47.06,886.02 -27.56,905.51 -27.56,924.33 -24.1,927.79 -24.1,931.37 -19.5,935.97 -19.5,1020.24 42.94,1082.68 43.31,1082.68 47.24,1086.61 102.36,1086.61 133.86,1118.11 192.52,1118.11 R28.2@284.96,1210.56
AFE0_CSN1: J1.B9 R29.2 | length 1424.7
  TopLayer w6: v1(153.19,574.8) 176.04,597.65 388.23,597.65 395.07,590.81 420.56,590.81 427.71,597.96 J1.B9@572.99,597.96
  BottomLayer w6: v1(153.19,574.8) 129.92,574.8 -36.06,740.78 -36.06,881.27 -16.56,900.76 -16.56,904.51 -11.53,909.54 -11.53,928.39 -8.5,931.42 -8.5,975.74 28.95,1013.19 72.44,1013.19 134.86,1075.61 189.79,1075.61 314.96,1200.79 314.96,1236.22 307.43,1243.75 297.59,1243.75 289.17,1252.17 R29.2@289.17,1252.95
AFE0_ID0: IC30.2 J1.A11 | length 442.1
  TopLayer w6: v1(174.55,691.59) 175.89,690.26 175.89,672.75 178.89,669.75 178.89,645.43 189.34,634.97 264.42,634.97 272.56,643.11 408.5,643.11 410.6,645.2 J1.A11@474.17,645.2
  BottomLayer w6: IC30.2@123.03,742.13 123.03,711.61 143.05,691.59 v1(174.55,691.59)
AFE0_ID1: IC30.3 J1.B11 | length 538.9
  TopLayer w6: v1(208.66,673.23) 304.23,673.23 308.75,677.75 400.62,677.75 420.29,658.07 435.08,658.07 435.86,658.86 438.23,658.86 440.32,660.95 J1.B11@572.99,660.95
  BottomLayer w6: IC30.3@97.44,742.13 97.44,701.77 125.98,673.23 v1(208.66,673.23)
AFE0_MISO0: IC21.13 J1.A10 | length 1445.9
  TopLayer w6: v1(153.19,623.64) 155.66,621.17 172.03,621.17 180.23,612.97 273.53,612.97 276.83,616.27 370.14,616.27 377.75,608.65 422.4,608.65 427.45,613.71 J1.A10@474.17,613.71
  Signal Layer 1 w6: v1(27.56,1602.36) 27.56,1470.57 30.11,1468.02 30.11,1453.24 27.56,1450.69 27.56,1311.02 124.35,1214.24 124.35,651.93 152.64,623.64 v1(153.19,623.64)
  BottomLayer w6: IC21.13@-53.15,1602.36 v1(27.56,1602.36)
AFE0_MISO1: IC21.14 J1.B10 | length 1559.5
  TopLayer w6: v1(153.19,648.32) 155.81,645.7 163.05,645.7 184.78,623.97 268.98,623.97 274.46,629.46 J1.B10@572.99,629.46
  Signal Layer 1 w6: v1(49.21,1627.95) 49.21,1340.55 137.8,1251.97 137.8,1184.64 135.35,1182.19 135.35,1167.41 153.54,1149.22 153.54,670.17 153.19,669.81 v1(153.19,648.32)
  BottomLayer w6: IC21.14@-53.15,1627.95 v1(49.21,1627.95)
AFE0_MOSI01: J1.A9 R90.2 | length 2332.4
  TopLayer w6: v1(186.11,576.95) 186.44,577.29 285.99,577.29 288.51,579.81 391.03,579.81 397.88,572.97 428.16,572.97 435.91,580.72 472.69,580.72 J1.A9@474.17,582.21
  Signal Layer 1 w6: v1(119.57,2448.82) 119.57,2448.71 106.3,2435.44 106.3,2110.24 59.06,2062.99 59.06,1913.39 101.72,1870.72 101.72,1543.16 241.26,1403.62 241.26,1359.37 244.3,1356.34 244.3,1341.56 241.47,1338.72 241.47,1178.48 200.79,1137.8 200.79,1123.77 195.01,1117.99 195.01,684.81 178.89,668.69 178.89,645.43 185.04,639.27 185.04,578.03 v1(186.11,576.95)
  BottomLayer w6: v1(119.57,2448.82) 119.57,2419.61 R90.2@122.05,2417.13
AFE0_SCLK01: J1.B8 R85.2 | length 1896.7
  TopLayer w6: v1(361.17,561.97) 435.83,561.97 440.32,566.46 J1.B8@572.99,566.46
  Signal Layer 1 w6: v1(98.43,1921.26) 145.67,1874.02 145.67,1759.84 283.46,1622.05 283.46,1527.56 265.75,1509.84 265.75,1155.51 220.47,1110.24 220.47,908.3 257.75,871.03 257.75,665.39 v1(361.17,561.97)
  BottomLayer w6: R85.2@-29.53,1967.72 -29.53,1946.85 0,1917.32 76.58,1917.32 79.58,1920.32 97.49,1920.32 v1(98.43,1921.26)
AFE1_CSN0: J13.A8 R77.2 | length 208.5
  TopLayer w6: v1@389.63,1328.91 v1(392.25,1331.53) 395.96,1331.53 402.54,1338.12 J13.A8@474.17,1338.12
  BottomLayer w5: R77.2@289.17,1290.35 351.08,1290.35 v1(392.25,1331.53)
AFE1_CSN1: J13.B9 R78.2 | length 308.7
  TopLayer w6: v1@416.34,1378.73 v1(416.86,1378.21) 420.56,1378.21 427.71,1385.36 J13.B9@572.99,1385.36
  BottomLayer w5: R78.2@289.17,1327.76 359.25,1327.76 382.87,1351.38 390.02,1351.38 ; 390.05,1351.4 390.46,1351.4 400.62,1361.56 400.62,1361.98 v1(416.86,1378.21)
AFE1_ID0: IC30.4 J13.A11 | length 1316.5
  TopLayer w6: v1(377.61,1435.02) 380.23,1432.4 391.83,1432.4 393.72,1430.51 408.5,1430.51 410.6,1432.61 J13.A11@474.17,1432.61
  BottomLayer w6: IC30.4@71.85,742.13 71.85,744.44 68.26,748.03 3.94,748.03 -23.62,775.59 -23.62,878.14 -5.56,896.21 -5.56,899.95 -0.53,904.98 -0.53,923.83 2.5,926.86 2.5,971.19 31.32,1000 74.8,1000 113.36,1038.56 420.45,1038.56 444.88,1062.99 444.88,1401.57 425.2,1421.26 391.37,1421.26 v1(377.61,1435.02)
AFE1_ID1: IC30.5 J13.B11 | length 1335
  TopLayer w6: v1(401.11,1448.35) 403.2,1446.26 438.23,1446.26 440.32,1448.35 J13.B11@572.99,1448.35
  BottomLayer w6: IC30.5@37.4,776.57 -0.98,776.57 -11.81,787.4 -11.81,874.4 5.44,891.65 5.44,893.39 10.47,898.42 10.47,919.27 13.5,922.31 13.5,966.63 32.76,985.88 76.43,985.88 118.11,1027.56 437.01,1027.56 456.69,1047.24 456.69,1417.32 458.14,1418.77 430.29,1446.62 402.84,1446.62 v1(401.11,1448.35)
AFE1_MISO0: IC21.15 J13.A10 | length 707.9
  TopLayer w6: v1(346.46,1393.7) 348.81,1396.06 422.4,1396.06 427.45,1401.11 J13.A10@474.17,1401.11
  BottomLayer w6: IC21.15@-53.15,1653.54 -47.29,1647.68 53.1,1647.68 54.99,1645.8 56.6,1645.8 67.06,1635.34 67.06,1633.73 80.72,1620.06 80.72,1598.08 82.68,1596.13 82.68,1547.74 147.28,1483.14 297.43,1483.14 315.7,1464.87 322.38,1464.87 346.59,1440.66 346.59,1393.83 v1(346.46,1393.7)
AFE1_MISO1: IC21.12 J13.B10 | length 706.8
  TopLayer w6: v1(328.75,1419.47) 351.36,1419.47 354.83,1416 572.13,1416 J13.B10@572.99,1416.86
  BottomLayer w6: IC21.12@-53.15,1576.77 22.64,1576.77 126.97,1472.44 142.42,1472.44 142.72,1472.14 290.94,1472.14 309.22,1453.87 317.82,1453.87 328.28,1443.41 328.28,1419.95 v1(328.75,1419.47)
AFE1_MOSI01: J13.A9 R92.2 | length 1458.2
  TopLayer w6: v1(165.35,1454.3) 165.35,1450.6 174.65,1441.3 174.65,1432.71 241.23,1366.13 399.36,1366.13 405.12,1360.37 428.16,1360.37 435.91,1368.13 472.69,1368.13 J13.A9@474.17,1369.61
  Signal Layer 1 w6: v1(86.61,2448.82) 86.61,2122.05 47.24,2082.68 47.24,1909.45 86.61,1870.08 86.61,1520.75 146.73,1460.63 155.32,1460.63 161.65,1454.3 v1(165.35,1454.3)
  BottomLayer w6: R92.2@84.65,2417.13 86.61,2419.09 v1(86.61,2448.82)
AFE1_SCLK01: J13.B8 R86.2 | length 1113.2
  TopLayer w6: v1(226.46,1348.95) 289.93,1348.95 294.85,1353.87 354.62,1353.87 359.11,1349.37 435.83,1349.37 440.32,1353.87 J13.B8@572.99,1353.87
  Signal Layer 1 w6: v1(27.56,1937.01) 27.56,1905.51 74.8,1858.27 74.8,1405.51 131.37,1348.95 v1(226.46,1348.95)
  BottomLayer w6: R86.2@17.72,1967.72 17.72,1946.85 v1(27.56,1937.01)
AFE2_CSN0: J15.A8 R79.2 | length 928.2
  TopLayer w6: v1@398.33,2115.79 v1(400.95,2118.41) 404.66,2118.41 411.24,2125 J15.A8@482.87,2125
  BottomLayer w6: R79.2@289.17,1365.16 326.77,1365.16 327.76,1366.14 350.39,1366.14 364.3,1380.05 364.3,1405.51 358.27,1411.54 358.27,2075.73 v1(400.95,2118.41)
AFE2_CSN1: J15.B9 R80.2 | length 1044
  TopLayer w6: v1(424.84,2166.14) 427.46,2168.76 436.32,2168.76 439.8,2172.24 J15.B9@581.69,2172.24
  Signal Layer 1 w6: v1(311.89,1401.44) 311.89,1403.66 287.4,1428.15 287.4,1503.94 350.39,1566.93 350.39,1763.78 460.63,1874.02 460.63,2130.36 v1(424.84,2166.14)
  BottomLayer w6: R80.2@289.17,1402.56 290.29,1401.44 v1(311.89,1401.44)
AFE2_ID0: IC30.7 J15.A11 | length 1953.2
  TopLayer w6: v1(384.4,2218.57) 384.68,2218.29 414.94,2218.29 416.32,2219.67 J15.A11@482.69,2219.67
  BottomLayer w6: IC30.7@37.4,827.76 23.62,827.76 7.87,843.5 7.87,874.21 121.04,987.38 149.41,1015.75 444.88,1015.75 472.44,1043.31 472.44,2200.79 454.66,2218.57 v1(384.4,2218.57)
AFE2_ID1: IC30.8 J15.B11 | length 2000.8
  TopLayer w6: v1(400.59,2237.2) 402.56,2235.24 J15.B11@581.69,2235.24
  BottomLayer w6: IC30.8@37.4,853.35 37.4,888.18 153.16,1003.94 454.82,1003.94 486.32,1035.43 486.32,2214.47 463.58,2237.2 v1(400.59,2237.2)
AFE2_MISO0: IC21.1 J15.A10 | length 758.9
  TopLayer w6: v1(389.06,2182.6) 416.84,2182.6 422.75,2188.51 J15.A10@480.42,2188.51
  BottomLayer w6: IC21.1@179.13,1679.13 198.82,1679.13 204.68,1684.99 204.68,1870.22 211.79,1877.33 211.79,1915.2 213.24,1916.65 213.24,1940.54 211.79,1942 211.79,1977.89 267.72,2033.82 267.72,2161.42 292.83,2186.53 337.13,2186.53 341.05,2182.6 v1(389.06,2182.6)
AFE2_MISO1: IC21.5 J15.B10 | length 1132.6
  TopLayer w6: v1(409.45,2200.45) 413.15,2200.45 416.97,2204.26 579.46,2204.26 J15.B10@580.83,2202.88
  Signal Layer 1 w6: v1(185.38,2200.45) v1(409.45,2200.45)
  BottomLayer w6: IC21.5@179.13,1576.77 140.72,1576.77 138.76,1578.74 v1(119.57,1578.74) 104.99,1593.32 104.99,1603.52 101.72,1606.78 101.72,1885.19 144.22,1927.69 144.22,1937.63 155.22,1948.63 155.22,1966.35 189.79,2000.91 189.79,2118.15 198.51,2126.88 198.51,2141.66 189.79,2150.39 189.79,2170.97 185.38,2175.38 v1(185.38,2200.45)
AFE2_MOSI01: J15.A9 R93.2 | length 851.8
  TopLayer w6: v1(153.47,2157.55) v1(153.47,2488.11) ; v1(391.56,2157.55) 395.26,2157.55 404.52,2148.3 431.8,2148.3 434.91,2151.41 437.92,2151.41 442.04,2155.53 480.87,2155.53 J15.A9@481.39,2155.01
  Signal Layer 1 w6: v1(153.47,2157.55) v1(391.56,2157.55)
  BottomLayer w6: R93.2@20.67,2419.09 20.67,2461.61 47.17,2488.11 v1(153.47,2488.11)
AFE2_SCLK01: J15.B8 R87.2 | length 695.9
  TopLayer w6: v1(381.89,2134.84) 383.3,2136.25 435.31,2136.25 439.46,2140.41 448.68,2140.41 449.02,2140.75 J15.B8@581.69,2140.75
  Signal Layer 1 w6: v1(180.67,2134.27) 180.97,2134.57 381.61,2134.57 v1(381.89,2134.84)
  BottomLayer w6: R87.2@70.87,1967.72 71.65,1967.72 93.19,1946.19 98.73,1946.19 111.85,1933.07 124.11,1933.07 144.22,1953.18 144.22,1970.9 178.79,2005.47 178.79,2132.39 v1(180.67,2134.27)
AFE3_CSN0: J14.A8 R81.2 | length 1686.8
  TopLayer w6: v1@389.63,2903.71 v1(392.25,2906.33) 395.96,2906.33 402.54,2912.92 J14.A8@474.17,2912.92
  Signal Layer 1 w6: v1(310.43,1436.02) 310.43,1507.28 362.2,1559.06 362.2,1744.09 476.38,1858.27 476.38,2418.23 389.76,2504.85 389.76,2903.84 v1(392.25,2906.33)
  BottomLayer w6: R81.2@289.17,1438.98 R81.2@292.13,1436.02
  BottomLayer w10: R81.2@292.13,1436.02 v1(310.43,1436.02)
AFE3_CSN1: J14.B9 R83.2 | length 2019.3
  TopLayer w6: v1(157.48,2952.76) 159.57,2954.85 259.84,2954.85 422.39,2954.85 427.71,2960.17 J14.B9@572.99,2960.17
  Signal Layer 1 w6: v1(12.26,1460.63) 9.72,1463.18 9.72,2096.33 27.56,2114.17 27.56,2464.57 15.39,2476.74 15.39,2810.66 v1(157.48,2952.76)
  BottomLayer w6: R83.2@-24.02,1460.63 v1(12.26,1460.63)
AFE3_ID0: IC30.9 J14.A11 | length 2628.6
  TopLayer w6: v1(376.5,3008.65) 379.12,3006.03 393.01,3006.03 393.72,3005.31 408.5,3005.31 410.6,3007.41 J14.A11@474.17,3007.41
  BottomLayer w6: IC30.9@71.85,887.8 71.85,901.57 162.4,992.13 468.5,992.13 500,1023.62 500,2885.15 v1(376.5,3008.65)
AFE3_ID1: IC30.10 J14.B11 | length 2751.8
  TopLayer w6: v1(401.11,3023.16) 403.2,3021.06 438.23,3021.06 440.32,3023.16 J14.B11@572.99,3023.16
  BottomLayer w6: IC30.10@97.44,887.8 97.44,901.57 175.17,979.31 335.65,979.31 342.52,972.44 500,972.44 535.43,1007.87 535.43,1766.15 530.39,1771.2 530.39,2550.07 537.29,2556.98 537.29,2886.98 v1(401.11,3023.16)
AFE3_MISO0: IC21.2 J14.A10 | length 1642.6
  TopLayer w6: v1(248.03,2972.69) 249.86,2970.86 422.4,2970.86 427.45,2975.91 J14.A10@474.17,2975.91
  BottomLayer w6: IC21.2@179.13,1653.54 173.28,1659.4 147.69,1659.4 133.86,1673.23 133.86,1814.96 200.79,1881.89 200.79,1919.75 202.24,1921.21 202.24,1935.99 200.79,1937.44 200.79,2065.13 209.51,2073.86 209.51,2201.55 200.79,2210.27 200.79,2275.59 227.43,2302.23 227.43,2664.73 254.06,2691.37 254.06,2946.29 248.03,2952.32 v1(248.03,2972.69)
AFE3_MISO1: IC21.4 J14.B10 | length 1891.4
  TopLayer w6: v1(212.6,2996.06) 216.3,2996.06 221.56,2990.8 572.13,2990.8 J14.B10@572.99,2991.66
  Signal Layer 1 w6: v1(119.57,1614.17) 119.57,1872.56 74.8,1917.32 74.8,2047.24 119.57,2092.01 119.57,2148.89 137.41,2166.73 137.41,2456.21 135.63,2457.99 135.63,2560.82 218.63,2643.83 218.63,2959.94 212.6,2965.97 v1(212.6,2996.06)
  BottomLayer w6: v1(119.57,1614.17) 122.59,1614.17 134.4,1602.36 IC21.4@179.13,1602.36
AFE3_MOSI01: J14.A9 R94.2 | length 920.6
  TopLayer w6: v1(185.04,2937.01) 420.11,2937.01 427.52,2944.42 J14.A9@474.17,2944.42
  BottomLayer w6: R94.2@-31.5,2419.09 -31.5,2444.07 3.94,2479.5 3.94,2791.34 147.51,2934.91 182.94,2934.91 v1(185.04,2937.01)
AFE3_SCLK01: J14.B8 R89.2 | length 1358.6
  TopLayer w6: v1(192.91,2897.64) 212.35,2917.07 352.01,2917.07 359.11,2924.17 435.83,2924.17 440.32,2928.67 J14.B8@572.99,2928.67
  BottomLayer w6: R89.2@124.02,1967.91 124.8,1967.91 165.48,2008.59 165.48,2106.66 162.83,2109.31 162.83,2141.66 173.23,2152.06 173.23,2177.1 167.54,2182.79 167.54,2257.9 192.91,2283.27 v1(192.91,2897.64)
AFE_SPI_CS: IC17.4 R110.1 | length 11382
  TopLayer w5: R110.1@7731.1,1748.03 7735.04,1751.97 v1(7767.72,1751.97)
  Signal Layer 1 w5: v1(-97.44,1315.94) -55.12,1273.62 -55.12,1169.29 -19.69,1133.86 -19.69,815.59 -20.39,814.88 -20.39,792.23 -19.69,791.52 -19.69,464.57 231.97,212.91 380.85,212.91 389.35,204.41 679.09,204.41 692.71,190.79 695.04,190.79 708.66,177.17 1049.68,177.17 1142.21,84.63 1468.15,84.63 1477.33,93.81 1647.74,93.81 1680.22,126.3 1680.22,132.86 1717.7,170.34 2086.47,170.34 2096.6,180.47 2258.97,180.47 2366.66,72.78 3266.7,72.78 3292.93,46.55 3292.93,36.27 3324.55,4.65 3483.19,4.65 3515.57,37.04 3597.38,37.04 3603.49,30.93 3891.52,30.93 3897.62,37.04 4050.46,37.04 4058.37,29.13 4456.88,29.13 4463.28,35.53 4565.86,35.53 4578.81,22.59 5677.26,22.59 6066.85,412.18 6066.85,546.8 6067.56,547.5 6067.56,1914.69 6503.34,2350.48 7542.34,2350.48 7748.12,2144.7 7748.12,2042.69 7742.19,2036.77 7742.19,1907.41 7767.72,1881.89 v1(7767.72,1751.97)
  BottomLayer w5: v1(-97.44,1315.94) IC17.4@-50.2,1315.94